# Altium PCB TYPEC_4KTransmitter-v1.0.PcbDoc (part 11 of 12)
Units mil, origin at the board's own origin, x right, y up, seen from the top; angles counter-clockwise.
Board outline 2834.7 x 1259.84 mil, 10 copper layers (Top Layer, GND-1, Signal L1, GND-2, PWR-1, PWR-2, GND-3, Signal L2, GND-4, Bottom Layer), stack 61.686 mil thick; 475 components, 338 nets, 2161 pads, 1240 vias.
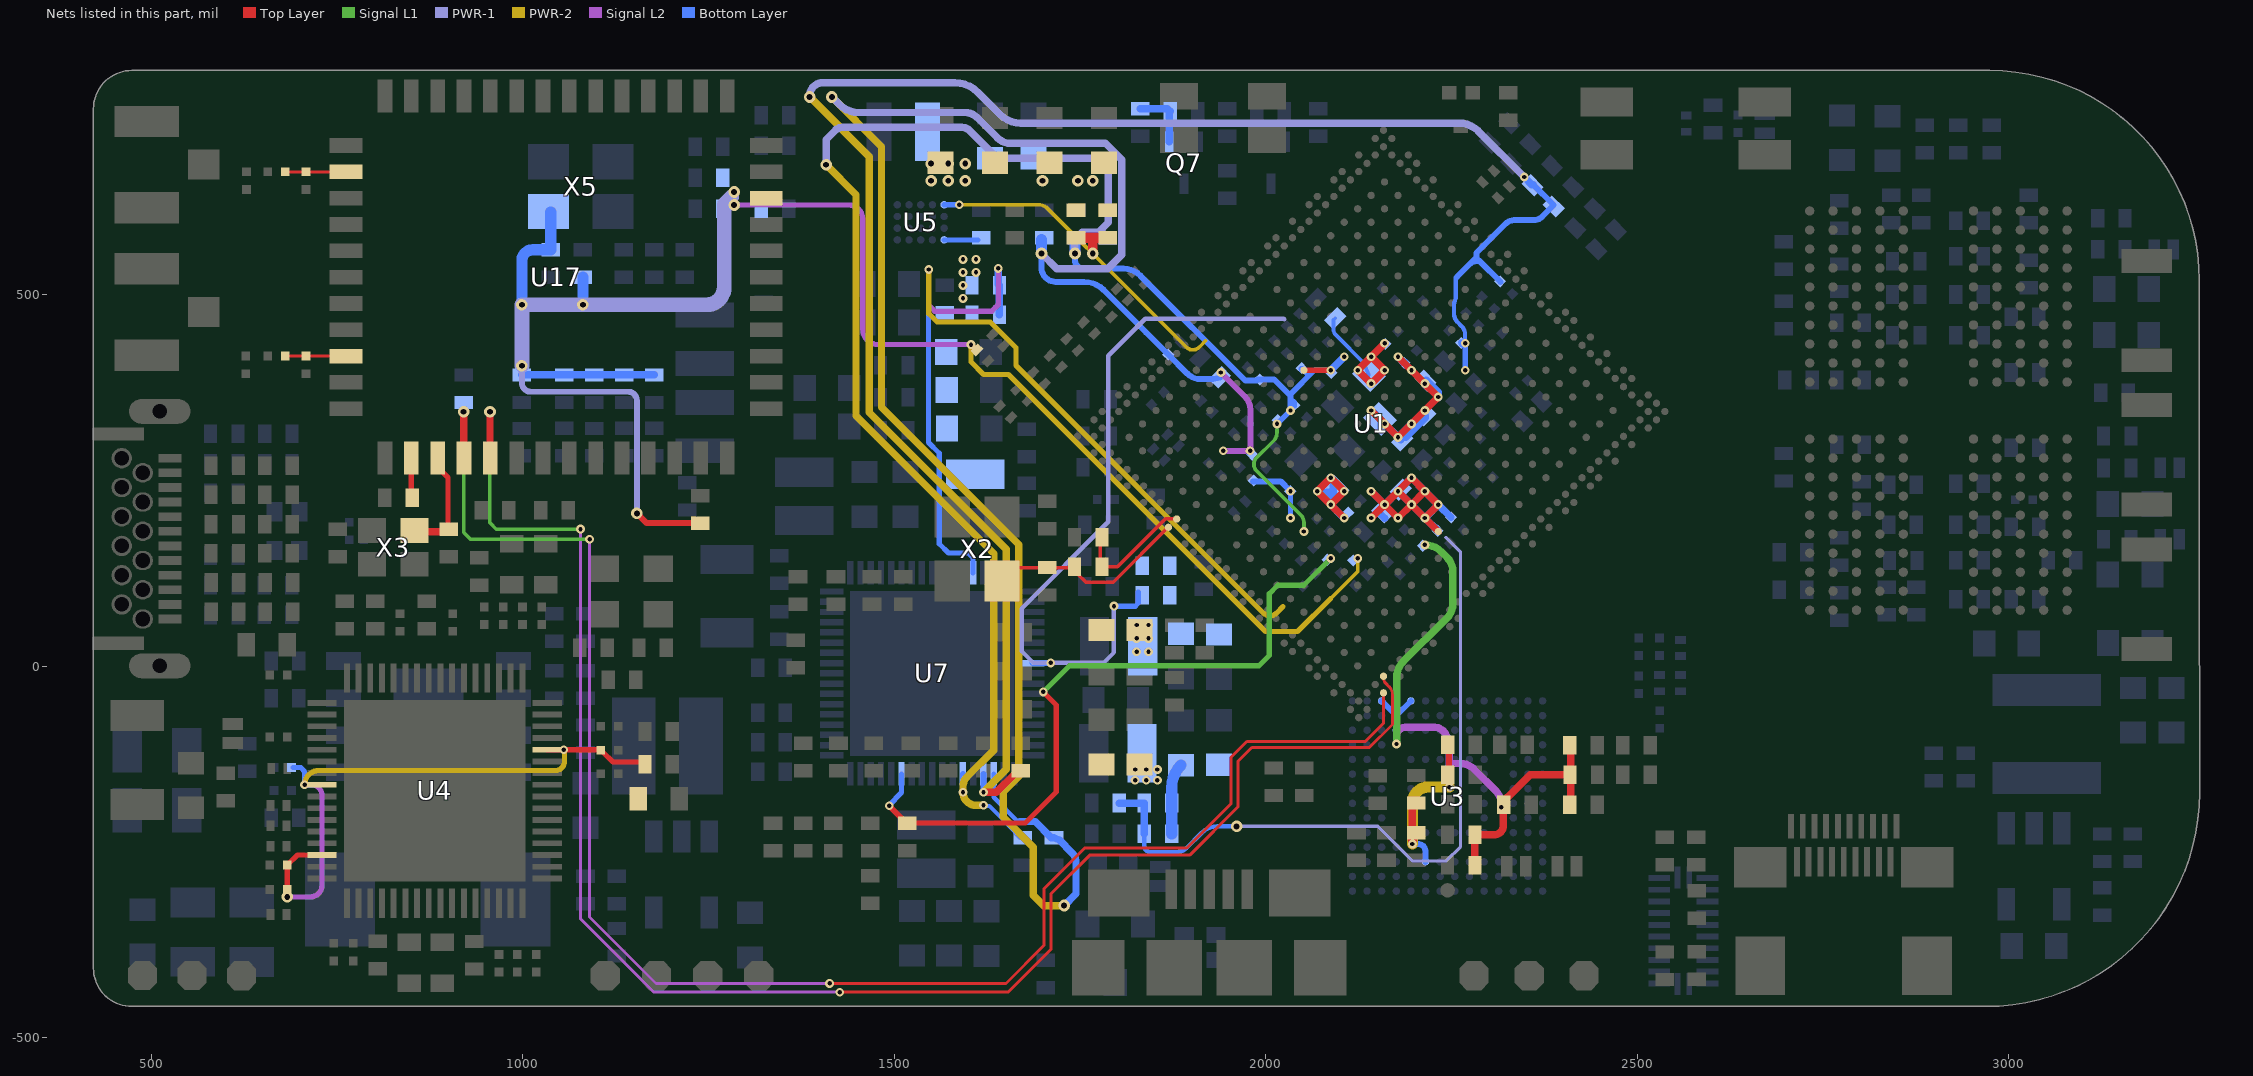
[diagram p17: the nets of this part, all layers, seen from the top]

## Via types
v1: diameter 11.81, hole 5.91, Top Layer to Bottom Layer, tented both sides, 710 vias
v2: diameter 15.75, hole 7.87, Top Layer to Bottom Layer, tented both sides, 265 vias
v3: diameter 11.81, hole 5.91, Top Layer to Signal L1, tented both sides, 146 vias
v4: diameter 11.81, hole 5.91, Signal L2 to Bottom Layer, 60 vias
v5: diameter 11.81, hole 5.91, Signal L1 to Signal L2, 38 vias
v6: diameter 11.81, hole 5.91, Top Layer to Signal L1, 16 vias
v7: diameter 11.81, hole 5.91, Top Layer to Bottom Layer, 4 vias
v8: diameter 11.81, hole 5.91, Signal L1 to Signal L2, tented both sides, 1 vias

## Nets (pads, with @x,y where several pads share a name; then routed paths per layer and width w, separated by ;. In a path a pad name is that pad's centre, name@x,y a point inside that pad or via, vN(x,y) a via of type N, cw(c..) or ccw(c..) an arc to the next point about the centre after c; other vN are vias at no path point) (continued)
VCCIO_FLASH: C133.2 C134.2 C192.2 C193.2 C194.2 C195.2 C253.2 R87.2 R105.1 R106.1 R107.1 U1.1C13 U3.C6 U3.M4 U3.N4 U3.P3 U3.P5 | length 1238.9
  Top Layer w4: v1(2317.36,-190.02) C193.2@2320.06,-192.72 ; C193.2@2318.85,-185.51 C193.2@2320.35,-184.01
  Top Layer w8: C195.2@2245.1,-144.49 cw(c2239.67,-149.93) 2247.36,-149.93 v1(2247.36,-162.98) ; C194.2@2246.47,-104.83 2246.57,-104.94 C195.2@2246.57,-144.49
  Top Layer w10: C192.2@2197.6,-224.45 R107.1@2197.6,-184.31 ; R105.1@2281.79,-268.42 R106.1@2281.79,-227.4 2307.18,-227.4 ccw(c2307.18,-214.52) 2320.06,-214.52 C193.2@2320.06,-192.72 ; C193.2@2320.7,-181.16 2325.35,-176.51 2326.09,-176.51 2356.13,-146.47 C134.2@2409.7,-146.47 ; R87.2@2410.82,-185.07 C134.2@2410.82,-142.83 ; C134.2@2410.82,-142.48 C253.2@2410.82,-102.51
  Top Layer w12: v1(2197.6,-239.54) C192.2@2197.6,-225.45
  Signal L1 w10: v1@2176.33,-104.84 2176.33,-15.68 cw(c2207.17,-15.76) 2185.47,6.14 2242.31,62.98 2243.53,64.07 ccw(c2226.37,83.28) 2252.13,83.28 ; v1(2214.42,162.97) cw(c2214.42,131.88) 2236.4,153.86 2244.27,146 cw(c2225.29,127.02) 2252.13,127.02 2252.13,83.33
  PWR-2 w15: v1(2197.6,-239.54) 2197.6,-183.98 cw(c2218.6,-183.98) 2218.6,-162.98 v1(2247.36,-162.98)
  Signal L2 w10: v1(2176.19,-104.98) 2176.21,-94.25 cw(c2187.87,-94.25) 2187.87,-82.59 2227.94,-82.59 cw(c2227.94,-97.59) 2238.54,-86.98 cw(c1733.81,-591.82) 2238.87,-87.31 cw(c2218.17,-107.9) 2247.37,-107.9 2247.37,-131.21 ; v1(2247.36,-162.98) 2247.37,-131.21 ; v1(2317.36,-190.02) 2317.36,-185.56 ccw(c2293.67,-185.56) 2310.42,-168.81 2280.23,-138.62 ccw(c2262.3,-156.61) 2262.3,-131.21 2247.37,-131.21
  Bottom Layer w8: U3.P3@2156.27,-47.02 U3.N4@2175.96,-66.71 U3.M4@2175.96,-86.39 v1@2175.96,-104.98 ; U3.N4@2175.96,-66.71 U3.P5@2195.64,-47.02 ; v1(2197.6,-239.54) 2205.1,-239.54 cw(c2205.1,-249.77) 2215.33,-249.77 U3.C6@2215.33,-263.56
VCCIO_SD: C19.2 C107.2 U1.1F17 U7.29 | length 956.1
  Top Layer w7: C19.2@1517.68,-211.51 1676.41,-211.51 1718.15,-169.77 1718.15,-52.32 v3(1700.68,-34.85)
  Top Layer w8: v1@1493.32,-188.35 1509.18,-204.22 1509.18,-206.51 1514.18,-211.51 C19.2@1517.68,-211.51
  Signal L1 w7: v3@1700.7,-34.87 1735.92,0.36 1991.02,0.36 2005.01,14.35 2005.01,97.13 2016.48,108.6 2051.48,108.6 v1(2087.75,144.87)
  Bottom Layer w7: v1@1493.32,-187.84 1509.93,-170.25 U7.29@1509.93,-145.21
  Bottom Layer w8: v1(2087.75,144.87) C107.2@2088.9,143.73
  other v1: 1493.32,-188.14
VCCIO_WL: C77.1 C78.2 C150.2 C257.1 R9.1 R51.1 R94.1 R135.1 R136.1 R137.1 R138.1 R139.1 R140.2 U1.1E16 U17.34 X5.4 | length 2554.1
  Top Layer w7: v1(1603.56,432.63) 1603.9,432.63 1610.93,425.59 R9.1@1611.27,425.59
  Top Layer w8: v2(1153.78,205.5) 1167.05,192.23 R51.1@1239.21,192.23
  PWR-1 w8: v2(998.94,404.23) 998.94,381.28 ccw(c1011.07,381.28) 1011.07,369.16 1141.97,369.16 cw(c1141.97,357.34) 1153.78,357.34 v2(1153.78,205.5)
  PWR-1 w10: 1276.22,620.44 v2(1284.72,620.44)
  PWR-1 w20: v2(998.94,404.23) v2(998.94,486.22) v2(1081.12,486.22) 1247.69,486.22 ccw(c1247.69,509.87) 1271.34,509.87 1271.34,621.2 v2@1281.32,631.18
  PWR-2 w5: 2087.2,90.59 2123.94,127.33 v1(2123.94,144.87)
  PWR-2 w7: v1(1603.56,432.63) 1603.56,409.46 1620.49,392.53 1653.8,392.53 1999.93,46.4 2043.01,46.4 2087.2,90.59
  Signal L2 w7: v2(1284.72,620.44) 1439.31,620.44 cw(c1439.31,602.01) 1457.74,602.01 1457.74,453.13 ccw(c1478.25,453.13) 1478.25,432.63 v1(1603.56,432.63)
  Bottom Layer w10: R135.1@998.94,391.73 R136.1@1055.81,391.73 R137.1@1096.24,391.73 R138.1@1136.67,391.73 R139.1@1177.11,391.73
  Bottom Layer w15: v2(998.94,486.22) 998.94,545.31 cw(c1013.86,545.31) 1002.61,555.11 1004.06,556.56 cw(c1013.86,545.31) 1013.86,560.23 C257.1@1037.8,560.23 X5.4@1037.8,611.02 ; v2(1081.12,486.22) R94.1@1081.12,523.23
  other v2: 1284.72,638.09
VDD: C177.2 C263.2 C269.2 C284.2 C285.2 FB6.2 U4.24 U4.30 U4.60 | length 847.7
  Top Layer w7: C285.2@683.24,-267.99 696.83,-254.39 U4.30@729.93,-254.39 ; C269.2@683.27,-297.54 C285.2@683.27,-268.02 ; U4.60@1033.07,-112.66 C177.2@1105.07,-112.66 ; C177.2@1105.37,-113.27 1105.37,-113.58 1107.47,-115.68 1107.78,-115.68 1121.46,-129.36 1163.64,-129.36 C263.2@1164.64,-128.36
  PWR-2 w7: v1(706.5,-159.84) cw(c725.56,-159.84) 725.56,-140.78 1044.13,-140.78 ccw(c1044.13,-128.41) 1056.5,-128.41 v1@1056.5,-112.73
  Signal L2 w7: v2(683.24,-310.72) 714.4,-310.72 ccw(c714.4,-295.19) 729.93,-295.19 729.93,-173.96 ccw(c715.81,-173.96) 715.81,-159.84 v1(706.5,-159.84)
  Bottom Layer w7: C284.2@691.38,-136.47 691.38,-136.74 701.28,-136.74 706.5,-141.95 v1(706.5,-159.84)
  other v1: 1055.5,-112.73
VDD_CPU: C44.1 C44.2 C46.2 C47.2 C48.2 C83.2 C84.2 C87.2 C91.2 C95.2 C99.2 C103.2 L2.2 R21.1 R21.2 U1.1C12 U1.1D11 U1.1D12 U1.1E11 U1.1E12 U1.1E13 U1.1F11 U1.1F12 U1.1F13 U1.1F14 U1.1G13 U5.A4 | length 1090.1
  Top Layer w10: v1(2142.04,199.16) v1(2160.13,217.25) v1(2196.33,253.44) v1(2214.42,235.35) ; v1(2142.04,235.35) v1(2178.23,199.16) v1(2196.33,217.25) ; v1(2178.23,235.35) v1(2196.33,217.25) ; U1.1C12@2232.52,181.06 v1(2214.42,199.16) ; v1(2196.33,217.25) v1(2214.42,235.35) ; v1(2196.33,217.25) v1(2214.42,199.16) ; v1(2214.42,199.16) v1(2232.52,217.25) v1(2214.42,235.35)
  Top Layer w13: v2(1767.35,555.15) 1767.35,576.53
  Top Layer w14: R21.2@1744.86,576.53 1767.35,576.53 C44.2@1787.36,576.53
  PWR-2 w5: v1(1587.53,620.88) 1694.12,620.88 1694.17,620.88 cw(c1694.15,603.47) 1706.47,615.76 1758.21,564.03 cw(c1466.48,254.28) 1767.09,555.42 v2(1767.35,555.15) 1893.41,429.09 ccw(c1902,437.68) 1902,425.54 ccw(c1902,437.68) 1910.58,429.09 1919.44,437.95
  Bottom Layer w7: U5.A4@1567.36,620.81 v1@1587.86,620.81
  Bottom Layer w10: v1(2142.04,235.35) v1@2158.4,218.99 ; C91.2@2155.36,203.91 C91.2@2160.11,199.16 ; v1(2160.13,217.25) v1(2178.23,235.35) ; v1@2218.35,203.09 v1(2232.52,217.25) ; C83.2@2231.46,182.12 v1(2214.42,199.16) 2180.91,232.67 2180.91,238.03 v1(2178.23,235.35) ; C87.2@2249.56,200.21 v1(2232.52,217.25) ; v1(2178.23,235.35) v1(2196.33,253.44) v1(2214.42,235.35) v1(2232.52,217.25)
  other v2: 1549.86,653.19 1572.86,653.19 1595.86,653.19 1699.86,653.19 1747.36,653.19 1767.36,653.19 1549.86,676.19 1572.86,676.19 1595.86,676.19
VDD_GPU: C60.1 C60.2 C62.1 C64.2 C89.2 C93.2 C97.2 C101.2 C105.2 L4.1 R19.1 R19.2 U1.1L8 U1.1L9 U1.1M7 U1.1M8 U1.1M9 U7.8 | length 1200
  Top Layer w10: v1(2160.14,434.4) v1(2142.04,416.3) ; v1(2142.04,416.3) v1(2123.94,398.21) v1(2142.04,380.11) v1(2160.14,398.21) v1(2142.04,416.3)
  PWR-1 w6: v1(1795.92,80.6) 1795.92,18.25 1781.81,4.13 v1(1710.97,4.13) 1687.57,4.13 1671.54,20.16 1671.54,77.25 1788.25,193.96 1788.25,417.63 1837.85,467.24 2024.31,467.24 2024.82,466.72
  Bottom Layer w5: C93.2@2093.78,468.07 2091.3,465.6 2091.3,452.87 ccw(c2100.79,452.87) 2094.08,446.16 C105.2@2133.6,406.63 ; C105.2@2133.1,406.93 C105.2@2138.98,391.59
  Bottom Layer w6: v1@1710.81,3.97 v1(1710.97,4.13)
  Bottom Layer w7: v1@1795.98,80.55 1824.58,80.55 1828.68,84.65 C60.2@1828.68,99.53
  Bottom Layer w8: U7.8@1686.51,3.81 v1@1710.65,3.81
  other v1: 1826.36,19.13 1842.36,19.13 1826.36,37.13 1842.36,37.13 1826.36,55.13 1842.36,55.13
VDD_LOGIC: C51.1 C51.2 C61.1 C63.2 C88.2 C92.2 C96.2 C98.2 C100.2 C104.2 C262.2 L3.1 R18.1 R18.2 R20.1 U1.1H7 U1.1H8 U1.1H9 U1.1H10 U1.1J7 U1.1J10 U1.1K7 U1.1K10 U1.1L7 | length 1589.4
  Top Layer w10: v1(2142.04,343.92) v1(2160.14,325.83) v1(2178.23,307.73) v1(2232.52,362.02) v1(2214.42,380.11) v1(2196.33,398.21) v1(2178.23,416.3)
  PWR-1 w4.5: v2(1961.01,-215.86) 2151.01,-215.86 2197.59,-262.44 2242.95,-262.44 2262.36,-243.03 2262.36,152.97 2242.31,173.02
  Bottom Layer w6: R18.1@1836.68,-225.97 1836.68,-241.97 ccw(c1845.24,-241.97) 1845.24,-250.53 1880.18,-250.53 ccw(c1880.18,-231.8) 1893.42,-245.05 1914.02,-224.45 cw(c1934.71,-245.1) 1934.71,-215.86 v2(1961.01,-215.86)
  Bottom Layer w8: v1@2181.18,413.36 2209.63,384.9 C262.2@2216.21,384.9 ; C96.2@2211.61,341.11 v1(2214.42,343.92) v1(2232.52,362.02)
  Bottom Layer w10: R20.1@1802.89,-184.42 R20.1@1802.89,-184.42 1820.14,-184.47 1820.19,-184.51 1820.23,-184.47 C51.1@1836.73,-184.47 ; C51.1@1836.68,-184.42 C51.1@1836.73,-184.47 ; R18.1@1836.82,-225.97 1836.82,-184.56 C51.1@1836.73,-184.47 ; v1(2160.14,325.83) v1(2142.04,343.92) 2142.83,343.92 C92.2@2178.62,308.12 ; v1(2178.23,307.73) C92.2@2179.02,307.73 ; v1(2178.23,416.3) 2185.97,408.56 C88.2@2187.55,408.56 ; C92.2@2181.76,304.67 2181.76,304.98 C92.2@2179.02,307.73 ; C96.2@2214.42,342.9 C96.2@2214.42,343.08 ; v1(2214.42,343.92) C96.2@2214.42,343.08 ; C96.2@2215.27,337.11 2215.27,334.37 2188.63,307.73 C92.2@2179.02,307.73 ; C262.2@2216.21,384.9 2232.52,368.6 v1(2232.52,362.02) ; C92.2@2178.62,308.12 v1(2196.33,325.83) 2196.67,326.17 2197.7,326.17 2213.52,341.99 2213.52,342.53 2214.07,343.08 C96.2@2214.42,343.08 ; C92.2@2178.62,308.12 C92.2@2179.02,307.73
  Bottom Layer w15: R18.2@1873.68,-225.97 C51.2@1873.68,-184.42 1873.68,-163.65 cw(c1916.36,-163.65) C63.2@1886.18,-133.47
  other v1: 1824.36,-153.91 1839.36,-153.91 1854.36,-153.91 1824.36,-139.23 1839.36,-139.28 1854.36,-139.28
VDD_NPU: C69.2 C70.2 C72.1 C72.2 C90.2 C94.2 C102.2 C106.2 L6.1 R26.1 R26.2 U1.1G15 U1.1H14 U1.1H15 U1.1J14 U1.1J15 U7.64 | length 1644.8
  Top Layer w10: v1(2105.85,199.16) v1(2087.75,217.25) ; v1(2087.75,217.25) v1(2105.85,235.35) v1(2087.75,253.44) v1(2069.66,235.35) v1(2087.75,217.25)
  PWR-2 w7: v1(1546.77,533.62) 1546.77,474.19 1558.1,462.86 1629.37,462.86 1663.87,428.36 1663.87,404.57 1997.34,71.1 ccw(c2005.93,79.68) 2005.93,67.54 ccw(c2005.93,79.68) 2014.51,71.09 2023.37,79.95
  Signal L2 w7: v1(1546.77,533.62) 1546.27,533.12 1546.27,486.06 1554.84,477.49 1631.31,477.49 1640.32,486.5 v1(1640.32,535.1)
  Bottom Layer w7: v1(1546.77,533.62) 1546.27,533.12 1546.27,300.66 1560.68,286.24 1560.68,164.61 1573.27,152.02 1600.12,152.02 1606.25,145.89 1606.25,125.4 U7.64@1606.39,125.27
  Bottom Layer w10: v1(1640.32,535.1) 1640.46,534.96 1640.46,513.86 R26.1@1641.79,512.53 C72.2@1641.79,472.66 ; v1(2069.66,235.35) 2070.95,234.05 C94.2@2090.83,234.05 ; v1(2087.75,253.44) 2090.83,250.37 C94.2@2090.83,234.05 ; v1@2104.7,200.31 v1(2087.75,217.25) 2087.75,230.98 C94.2@2090.83,234.05
  other v1: 1592.79,494.73 1592.79,512.23 1592.79,529.73 1610.29,529.73 1592.79,547.23 1610.29,547.23
VDDA0V9_IMAGE: C13.2 C148.2 C149.1 C152.2 C160.2 C162.2 C171.2 C173.2 U1.1H17 U1.1N9 U1.1N10 U1.1N13 U1.1N14 U1.1P11 U7.23 | length 2513
  Top Layer w7: U1.1P11@2051.57,398.2 v1(2087.75,398.21)
  Signal L1 w5: v1(2015.37,325.83) 2015.37,313.92 cw(c2000.37,313.92) 2010.99,303.32 1987.2,279.53 ccw(c1994.27,272.46) 1984.27,272.46 1984.27,270.65 ccw(c1994.27,270.65) 1987.2,263.58 2047.17,203.61 cw(c2036.56,193) 2051.56,193 v1(2051.56,181.06)
  PWR-1 w10: v2(1408.49,674.57) 1408.49,708.66 1420.47,720.64 cw(c1431.07,710.03) 1431.07,725.03 1591.14,725.03 cw(c1591.14,710.03) 1601.74,720.64 1631,691.38 ccw(c1650.13,710.51) 1650.13,683.46 1774.3,683.46 1788.27,669.49 1788.27,597 1775.29,584.03 1753.21,584.03 1743.36,574.17 v2(1743.36,555.15)
  PWR-2 w10: v2(1408.49,674.57) 1448.74,634.32 1448.74,336.65 1633.97,151.42 1633.97,-113.36 1598.08,-149.25 ccw(c1611.09,-162.25) 1592.7,-162.25 v1(1592.7,-169.97) ccw(c1610.2,-169.97) 1610.2,-187.47 v1(1620.26,-187.47)
  Bottom Layer w4.1: U7.23@1592.61,-145.21 U7.23@1592.65,-145.25
  Bottom Layer w6: v1(1620.26,-187.47) 1621.23,-188.44 1628.36,-188.44 1663.68,-223.77 1663.68,-224.97 1669.68,-230.97 C13.2@1673.18,-230.97 ; v1(2033.47,343.92) C162.2@2039.47,349.92
  Bottom Layer w7: C160.2@2047.49,400.16 C160.2@2048.49,399.16 ; C160.2@2049.19,400.06 2058.4,390.85
  Bottom Layer w7.5: C162.2@2038.29,351.77 2038.29,354.82 2033.54,359.58 2033.54,365.79 2066.06,398.3 2087.66,398.3 v1(2087.75,398.21)
  Bottom Layer w8: v1@1592.65,-169.84 U7.23@1592.65,-145.25 ; v2(1743.36,555.15) 1743.36,546.39 ccw(c1755.06,546.4) 1752.99,534.89 1754.36,534.77 1808.89,534.77 cw(c1808.89,502.85) 1831.46,525.42 1972.68,384.2 1988.04,384.2 1989.51,385.68 2011.45,385.68 2033.44,363.68 v1(2033.47,343.92) ; C148.2@1743.36,574.03 cw(c1745.86,574.03) C148.2@1745.86,576.53 ; v1(2015.37,325.83) v1(2033.47,343.92)
  Bottom Layer w10: C149.1@2087.89,398.07 2105.85,416.02 v1(2105.85,416.3)
  Bottom Layer w15: v2(1743.36,555.15) C148.2@1743.36,574.03 ; C148.2@1745.86,576.53 C173.2@1787.36,576.53
VDDA0V9_PMU: C16.2 C119.1 C124.2 C131.2 C132.1 U1.1N16 U1.1P17 U7.20 | length 2738.3
  PWR-1 w10: v2(1416.19,765.98) 1426.66,755.5 ; 1426.69,755.48 ccw(c1451.96,780.8) 1451.96,745.03 1595.29,745.03 cw(c1595.29,721.94) 1611.61,738.27 1611.65,738.23 1639.12,710.77 ccw(c1656.89,728.54) 1656.89,703.4 1784.53,703.4 1806.54,681.39 1806.54,553.56 1787.8,534.83 1718.68,534.83 v2(1698.36,555.15)
  PWR-2 w10: v2(1416.19,765.98) 1483.05,699.11 1483.05,348.04 1667.6,163.5 1667.6,-148.5 1646.78,-169.31 1646.78,-203.25 1687.53,-244 1687.53,-308.8 1701.21,-322.47 v2(1728.85,-322.47)
  Signal L2 w8: v1(1939.85,395.03) 1972.26,362.62 1972.34,362.54 cw(c1955.1,345.35) 1979.45,345.35 v1@1979.45,289.9 ; v1(1942.99,289.64) v1(1979.18,289.64) v1(1942.99,289.64)
  Bottom Layer w6: U7.20@1633.95,-145.21 1633.95,-176.82 1666.73,-209.6
  Bottom Layer w7: v1@1943.09,289.73 1973.42,289.73 1975.52,287.64 C131.2@1977.49,287.64
  Bottom Layer w8: v2(1698.36,555.15) 1698.35,536.19 ccw(c1717.54,536.19) 1717.54,517 1755.63,517 cw(c1755.63,479.45) 1782.18,506 1839.12,449.06 C124.2@1869.01,419.17 1894.65,393.53 ccw(c1912.76,411.64) 1912.72,386.03 1928.95,386.03 C119.1@1938.44,388.45
  Bottom Layer w10: 1669.12,-209.33 1690.04,-209.33 1711.68,-230.97 C16.2@1715.18,-230.97 1722.68,-234.67 1739.21,-251.19 cw(c1725.5,-264.86) 1744.86,-264.88 1744.86,-306.46 v2(1728.85,-322.47)
  Bottom Layer w15: v2(1698.36,555.15) C132.1@1698.35,574.03
VDDA_0V9: C15.2 C121.1 C126.2 C135.2 C138.2 C139.2 C143.2 U1.1H5 U1.1J4 U1.1J17 U1.1K16 U7.21 | length 2686.4
  Top Layer w10: v1@1621.09,-169.97 1637.64,-169.97 1662.68,-144.93 1662.68,-144.76 1666.68,-140.76 C15.2@1670.18,-140.76
  PWR-1 w10: v2(1386.28,765.98) 1386.28,767.36 cw(c1403.99,767.36) 1403.99,785.06 1581.89,785.06 1581.96,785.06 cw(c1581.96,741.93) 1612.51,772.38 1641.36,743.53 1642.73,742.16 ccw(c1670.16,769.58) 1670.16,730.79 2260.05,730.79 cw(c2260.05,693.71) 2286.26,719.95 2286.32,719.89 v1(2348.06,658.14)
  PWR-2 w10: v2(1386.28,765.98) 1466.7,685.56 1466.7,341.24 1651.05,156.9 1651.05,-139.18 v1(1620.26,-169.97)
  Bottom Layer w4.1: v1@1620.17,-169.88 v1@1620.21,-169.84 ; U7.21@1620.17,-145.21 U7.21@1620.21,-145.25
  Bottom Layer w5.7: 2253.72,473.7 ccw(c2268.72,473.7) 2258.11,463.1 ; 2253.72,473.8 2253.72,487.34 cw(c2259.42,487.34) 2254.02,489.17 2255.01,492.08 ccw(c2231.01,500.24) 2255.03,492.16 2256.03,495.1 2256.03,522.76 ; 2258.12,463.1 2264.11,457.1 cw(c2253.51,446.49) 2268.51,446.49 ; C126.2@2268.51,434.5 2268.51,446.49 ; 2268.51,446.59 2268.51,446.49
  Bottom Layer w6: 2256.71,522.76 2257.71,523.76
  Bottom Layer w7: C135.2@2032.61,233.14 C135.2@2033.14,233.68 ; v1(2033.47,199.16) 2033.47,231.38 2033.14,231.7 C135.2@2033.14,233.68 ; v1(2033.47,235.35) 2033.14,235.02 C135.2@2033.14,233.68 ; C135.2@2033.86,234.39 C135.2@2033.14,233.68
  Bottom Layer w8: v1@1620.21,-169.84 U7.21@1620.21,-145.25 ; C121.1@1982.93,248.55 2020.27,248.55 v1(2033.47,235.35) ; 2257.71,523.76 2257.71,523.88 2275.62,541.8 ; C126.2@2262.71,435.52 2264.61,433.62 2268.71,429.52 v1(2268.71,398.21) ; C143.2@2316.3,516.85 2288.37,544.78 ; C139.2@2360.31,647.98 2387.81,620.48 2371.75,604.42 cw(c2361.14,615.03) 2361.14,600.03 2334.07,600.03 ccw(c2334.07,585.03) 2323.47,595.64 2283.91,556.08 2283.91,549.97 ; 2283.91,549.97 2283.8,549.97 2275.64,541.81 cw(c2282.83,534.59) 2282.83,544.78 2288.37,544.78 ; 2283.91,549.97 2283.91,549.24 2288.37,544.78
  Bottom Layer w10: C126.2@2264.61,433.62 2265.39,434.4 v1(2268.71,434.4) ; v1(2348.06,658.14) 2358.23,647.98 C139.2@2360.31,647.98
VSEL_EXTDCDC: R13.1 U5.A1 | length 45.6
  Bottom Layer w7: U5.A1@1567.36,573.56 R13.1@1612.93,573.56
WIFI_HOST_WAKE: U1.B34 U17.16 | length 2292.5
  Top Layer w4: v1(1426.96,-439.08) 1653.29,-439.08 1710.97,-381.41 1710.97,-306.91 1763.29,-254.58 1897.78,-254.58 1962.68,-189.68 1962.68,-128.5 1981.52,-109.66 2139.67,-109.66 2170.67,-78.67 2170.67,-38.47 ccw(c2155.61,-38.47) 2166.28,-27.84 ; U1.B34@2158.75,-13.81 2158.75,-16.15 ccw(c2168.78,-16.15) 2161.68,-23.24 2166.26,-27.82
  Top Layer w10: U17.16@956.08,280.16 v2(956.08,342.23)
  Signal L1 w4.7: v2(956.08,342.23) 956.08,192.94 964.71,184.3 v5(1077.88,184.3)
  Signal L2 w4: v5(1077.88,184.3) 1078.13,184.05 1078.13,-340.54 1176.67,-439.08 v1(1426.96,-439.08)
WIFI_REG_ON: R89.2 U1.A35 U17.15 | length 2279.1
  Top Layer w4: v1(1413.13,-427.18) 1650.55,-427.18 1701.47,-376.26 1701.47,-300.07 1756.46,-245.08 1893.84,-245.08 1953.18,-185.74 1953.18,-123.23 1974.75,-101.66 2134.24,-101.66 2158.75,-77.15 U1.A35@2158.75,-36.08
  Top Layer w10: U17.15@920.65,280.16 v2(920.65,342.23)
  Signal L1 w4.7: v2(920.65,342.23) 920.65,179.73 929.5,170.88 1089.71,170.88 v5(1090.13,170.46)
  Signal L2 w4: v5(1090.13,170.46) 1090.13,-337.83 1179.48,-427.18 v1(1413.13,-427.18)
WIFI_XTAL_IN: R159.2 U17.13 | length 53.2
  Top Layer w7: R159.2@850.21,230.05 U17.13@850.21,279.73 ; R159.2@855.35,226.73 R159.2@855.35,230.23
WIFI_XTAL_OUT: C273.2 U17.14 X3.1 | length 151.8
  Top Layer w7: U17.14@885.65,279.73 885.65,267.42 891.99,261.08 899.48,253.59 899.48,182.05 C273.2@900.64,180.89
  Top Layer w10: X3.1@854.4,182.15 855.66,180.89 C273.2@900.64,180.89
WL_ANT0: C6.1 C182.2 U17.2 | length 81.6
  Top Layer w4.2: C6.1@680.6,665.16 C182.2@708.29,665.16 U17.2@762.22,665.16
WL_ANT1: C7.1 C183.2 U17.9 | length 81.6
  Top Layer w4.2: C7.1@680.6,417.13 C183.2@708.29,417.13 U17.9@762.22,417.13
WORK_LED: Q7.1 R34.1 R42.2 | length 82.8
  Bottom Layer w10: R34.1@1831.36,750.23 1867.63,750.23 R42.2@1871.01,746.85 ; Q7.1@1870.39,705.5 1870.39,745.49 R42.2@1871.63,746.73
XIN24M: R43.2 R46.1 U1.AD37 | length 166.6
  Top Layer w4: U1.AD37@1879.64,197.05 U1.AD37@1880.36,197.77
  Top Layer w4.7: R43.2@1777.78,133.53 1800.62,133.53 1864.98,197.89 U1.AD37@1880.24,197.89 ; R43.2@1777.78,138.53 R46.1@1777.78,175.03
XOUT24M: C130.2 R43.1 U1.AD38 X2.3 | length 268.2
  Top Layer w4.7: X2.3@1648.25,114.22 1666.56,132.53 1702.28,132.53 1738.28,132.53 1747.73,123.08 1748.02,123.08 1758.21,112.88 1794.73,112.88 U1.AD38@1869.69,187.84
pads on no net: J2.4 J7.2 U1.1A4 U1.1A13 U1.1A15 U1.1A17 U1.1A18 U1.1B13 U1.1B17 U1.1B20 U1.1C2 U1.1C15 U1.1D2 U1.1D19 U1.1D20 U1.1E19 U1.1E20 U1.1F18 U1.1F19 U1.1H3 U1.1H19 U1.1H20 U1.1J19 U1.1J20 U1.1K19 U1.1K20 U1.1L1 U1.1N1 U1.1N2 U1.1N20 U1.1P2 U1.1P3 U1.1P4 U1.1P18 U1.1R1 U1.1R2 U1.1R16 U1.1R17 U1.1R18 U1.1T1 U1.1T2 U1.1T4 U1.1T18 U1.1T19 U1.1T20 U1.1U1 U1.1U3 U1.1U4 U1.1U5 U1.1U6 U1.1U8 U1.1U11 U1.1U19 U1.1U20 U1.1V2 U1.1V3 U1.1V8 U1.1V11 U1.1V15 U1.1V16 U1.1V20 U1.A22 U1.A26 U1.AA37 U1.AA38 U1.AB1 U1.AB2 U1.AB37 U1.AB38 U1.AC2 U1.AD1 U1.AF1 U1.AF37 U1.AG2 U1.AG37 U1.AH2 U1.AJ1 U1.AJ2 U1.AJ38 U1.AK2 U1.AK37 U1.AL1 U1.AL2 U1.AM1 U1.AM2 U1.AM37 U1.AM38 U1.AN2 U1.AN37 U1.AN38 U1.AP1 U1.AP3 U1.AP4 U1.AP5 U1.AP6 U1.AP7 U1.AP9 U1.AP10 U1.AP20 U1.AP21 U1.AP23 U1.AP24 U1.AP26 U1.AP27 U1.AP29 U1.AP30 U1.AR2 U1.AR4 U1.AR6 U1.AR7 U1.AR9 U1.AR10 U1.AR20 U1.AR21 U1.AR23 U1.AR24 U1.AR26 U1.AR27 U1.AR29 U1.AR30 U1.B22 U1.B26 U1.C37 U1.D37 U1.G38 U1.J37 U1.J38 U1.K37 U1.K38 U1.M37 U1.M38 U1.N37 U1.N38 U1.T37 U1.V37 U1.V38 U1.W37 U1.W38 U1.Y1 U1.Y2 U3.A1 U3.A2 U3.A7 U3.A8 U3.A9 U3.A10 U3.A11 U3.A12 U3.A13 U3.A14 U3.B1 U3.B7 U3.B8 U3.B9 U3.B10 U3.B11 U3.B12 U3.B13 U3.B14 U3.C1 U3.C3 U3.C5 U3.C7 U3.C8 U3.C9 U3.C10 U3.C11 U3.C12 U3.C13 U3.C14 U3.D1 U3.D2 U3.D3 U3.D4 U3.D12 U3.D13 U3.D14 U3.E1 U3.E2 U3.E3 U3.E5 U3.E8 U3.E9 U3.E10 U3.E12 U3.E13 U3.E14 U3.F1 U3.F2 U3.F3 U3.F10 U3.F12 U3.F13 U3.F14 U3.G1 U3.G2 U3.G3 U3.G10 U3.G12 U3.G13 U3.G14 U3.H1 U3.H2 U3.H3 U3.H12 U3.H13 U3.H14 U3.J1 U3.J2 U3.J3 U3.J12 U3.J13 U3.J14 U3.K1 U3.K2 U3.K3 U3.K6 U3.K7 U3.K10 U3.K12 U3.K13 U3.K14 U3.L1 U3.L2 U3.L3 U3.L12 U3.L13 U3.L14 U3.M1 U3.M2 U3.M3 U3.M7 U3.M8 U3.M9 U3.M10 U3.M11 U3.M12 U3.M13 U3.M14 U3.N3 U3.N6 U3.N7 U3.N8 U3.N9 U3.N10 U3.N11 U3.N12 U3.N13 U3.N14 U3.P1 U3.P2 U3.P7 U3.P8 U3.P9 U3.P10 U3.P11 U3.P12 U3.P13 U3.P14 U4.19 U4.31 U4.35 U4.36 U4.37 U4.38 U4.39 U4.40 U4.41 U4.42 U4.43 U4.44 U7.32 U7.34 U7.39 U7.40 U7.41 U7.42 U7.43 U7.60 U12.A1 U12.A2 U12.A11 U12.A12 U12.AA1 U12.AA12 U12.AB1 U12.AB2 U12.AB11 U12.AB12 U12.B1 U12.B12 U12.G11 U12.K5 U12.K8 U12.N5 U12.N8 U17.12 U17.33 U17.35 U17.37 U17.44 U17.45 U17.46 U17.47 U17.48

## Polygon pours and split planes (outlines as drawn)
VCCIO_FLASH on Signal L2 "VCCIO_FLASH_L08_P080" (solid, pour order 80): 2161.48,-106.72 2165.59,-110.83 2231.5,-110.83 2237.34,-116.67 2237.34,-193.42 2244.71,-200.79 2339.83,-200.79 2345.89,-194.73 2345.89,-68.17 2339.22,-61.5 2165.31,-61.5 2161.48,-65.33
GND on Signal L2 "GND_L08_P059" (solid, remove dead copper, pour order 59): 3158.57,-49.8 3171.08,-37.29 3171.08,25.75 3171.08,604.85 3034.41,741.52 682.16,741.52 ccw(c682.16,690.72) 631.36,690.72 631.36,-335.06 1072.65,-335.06 1173.48,-435.89 1173.48,-458.27 631.36,-458.27 422.36,-458.27 422.36,801.57 2974.44,801.57 cw(c2974.41,519.28) 3256.7,519.23 3257,171.83 3257.05,-170.52 cw(c2969.34,-170.57) 2969.38,-458.27 2504.21,-458.27 2504.21,-49.8
VCCA_1V8 on Signal L2 "SIG6-VCCA_1V8" (solid, remove dead copper, pour order 35): 2021.43,225.31 2034.68,212.07 2046.38,212.07 2186.56,352.26 2246.69,352.26 2280.02,385.59 2280.02,422.37 2295.3,437.65 2368.23,364.72 2368.23,334.87 2351.29,334.87 2196.9,180.49 2197.36,180.04 2197.36,24.48 2189.07,16.2 2038,16.2 2028.98,25.23 2028.98,105.95 1959.47,175.46 1806.93,175.46 1806.93,225.31
VDDA_0V9 on Signal L2 "VDDA_0V9_L08_P069" (solid, pour order 69): 1988.26,262.52 2196.33,470.59 2255.54,470.59 2281.1,445.03 2280.02,443.95 2280.02,385.59 2219.9,385.59 2051.56,217.25 2033.53,217.25
VCC_3V3 on Signal L2 "SIG6-VCC_3V3" (solid, remove dead copper, pour order 36): 2119.85,427.53 2132.35,427.53 2202.35,497.53 2222.35,497.53 2274.85,445.03 2287.35,445.03 2309.85,467.53 2309.85,540.03 2207.35,642.53 2187.35,642.53 2107.16,562.33 2107.16,440.22
GND on Bottom Layer "GND_L10_P071" (solid, remove dead copper, pour order 71): 422.36,-406.75 ccw(c473.88,-406.75) 473.88,-458.27 2969.38,-458.27 ccw(c2969.34,-170.56) 3257.05,-170.52 3257,171.83 3256.7,519.23 ccw(c2974.4,519.27) 2974.44,801.57 473.88,801.57 ccw(c473.88,750.05) 422.36,750.05
NetL2_1 on Bottom Layer "Bottom Layer-$25N1148" (solid, remove dead copper, pour order 12): 1457.74,602.01 1460.28,599.47 1523.09,599.47 1525.57,601.95 1525.57,639.15 1517.36,647.36 1517.36,758.53 1457.74,758.53
VCC3V3_SYS on Bottom Layer "VCC3V3_SYS_L10_P079" (solid, pour order 79): 1425.67,186.07 1450.03,186.07 1462.73,173.37 1475.66,173.37 1479.43,177.15 1479.43,226.42 1425.67,226.42
VCC_3V3 on Bottom Layer "Bottom Layer-VCC_3V3" (solid, remove dead copper, pour order 6): 1484.78,180.22 1478.04,173.48 1478.04,132.6 1486.82,132.6 1486.82,146.02 1507.2,166.4 1509.23,166.4 1509.39,166.56 1530.8,166.56 1532.68,168.44 1532.68,226.42 1484.78,226.42
NetL7_2 on Bottom Layer "Bottom Layer-$26N2279" (solid, remove dead copper, pour order 25): 1586.44,-192.17 1586.45,-240.28 1503.81,-240.28 1503.81,-194.31 1541.15,-194.31 1560.72,-174.74 1560.72,-129.46 1569.5,-129.46 1569.5,-168.97 ccw(c1593.84,-168.97)
VCCA_1V8 on Bottom Layer "VCCA_1V8_L10_P002" (solid, pour order 2): 1736.98,126.26 1745.24,134.53 1766.76,134.53 1775.22,134.53 1775.22,164.47 1914.08,164.47 1914.08,210.41 1838.83,210.41 1830.59,218.65 1807.74,218.65 1807.74,172.71 1720.92,172.71 1720.92,90.41 1707.05,76.54 1686.51,76.54 1686.51,68.99 1711.05,68.99 1736.98,94.92
NetL6_2 on Bottom Layer "Bottom Layer-$26N1977" (solid, remove dead copper, pour order 1): 1569.77,171.55 1579.47,161.85 1604.59,161.85 1620.75,145.69 1648.43,173.36 1648.43,222.3 1569.77,222.3
VCC3V3_SYS on Bottom Layer "VCC3V3_SYS_L10_P032" (solid, pour order 32): 1718.37,68.58 1713.04,63.26 1670.76,63.26 1670.76,50.68 1727.14,50.68 1727.14,68.58
VCC_1V8 on Bottom Layer "Bottom Layer-VCC_1V8" (solid, remove dead copper, pour order 9): 1334.18,225.12 1418.55,225.12 1418.55,280.56 1399.49,299.63 1399.49,424.49 1394.34,429.63 1349.11,429.63 1344.18,424.7 1344.18,314.58 1334.18,304.58
GND on Bottom Layer "Bottom Layer-GND 3" (solid, remove dead copper, pour order 23): 1612.62,448.53 1612.62,301.08 1615.3,298.4 1647.49,298.4 1652.62,303.53 1652.62,448.53 1647.62,453.53 1617.62,453.53
GND on Bottom Layer "GND_L10_P068" (solid, pour order 68): 448.03,-358.23 800.32,-358.23 819.36,-377.27 819.36,-458.27 468.8,-458.27 448.03,-437.5
VCC3V3_SYS on Bottom Layer "VCC3V3_SYS_L10_P065" (solid, pour order 65): 1340.01,-22.94 1364.09,-22.94 1368.76,-18.27 1368.76,4.15 1386.53,21.92 1431.78,21.92 1431.78,13.26 1395.8,13.26 1381.96,-0.58 1381.96,-60.8 1363.05,-79.71 1340.01,-79.71 1340.01,-67.8
VCC5V0_SYS on Bottom Layer "Bottom Layer-VCC5V0_SYS 1" (solid, remove dead copper, pour order 11): 1404.93,594.84 1404.93,535.2 1479.41,535.2 1479.41,425.75 1472.68,419.02 1472.68,392.53 1490.68,392.53 1490.68,417.53 1495.06,421.9 1531.24,421.9 1535.18,425.84 1535.18,531.47 1525.57,541.08 1525.57,592.37 1523.1,594.84
VDD_LOGIC on Bottom Layer "Bottom Layer-VDD_LOGIC" (solid, remove dead copper, pour order 24): 1894.95,-160.24 1850.13,-160.24 1798.47,-160.24 1798.47,-72.65 1854.86,-72.65 1854.86,-99.99 1950.82,-99.99 1954.68,-103.86 1954.68,-155.4 1949.84,-160.24
VCC5V0_SYS on Bottom Layer "VCC5V0_SYS_L10_P000" (solid, pour order 0): 782.47,-66.51 517.18,-66.51 517.18,-245.87 641.81,-245.87 641.81,-157.63 600.09,-157.63 600.09,-123.92 782.47,-123.92
VCC0V6_DDR on Bottom Layer "VCC0V6_DDR_L10_P054" (solid, pour order 54): 2978.52,2.63 3178.82,2.63 3178.82,98.85 3247.36,98.85 3247.36,-57.16 2978.52,-57.16
NetL5_1 on Bottom Layer "Bottom Layer-$26N4974" (solid, remove dead copper, pour order 5): 1452.84,180.22 1459.14,173.91 1459.14,152.74 1459.14,125.27 1450.48,125.27 1450.48,146.12 1441.48,155.13 1378.1,155.13 1362.33,170.9 1338.06,170.9 1334.18,174.77 1334.18,217.43 1418.55,217.43 1418.55,180.22
VCC3V3_SYS on Bottom Layer "VCC3V3_SYS_L10_P004" (solid, pour order 4): 448.03,-344.58 687.51,-344.58 687.51,-382.33 819.36,-382.33 819.36,-251.28 448.03,-251.28
NetL10_1 on Bottom Layer "NETL10_1_L10_P053" (solid, pour order 53): 3043.51,-181.19 cw(c3043.51,-190.86) 3053.18,-190.87 3053.18,-240.57 3108.89,-240.57 3108.89,-199.13 3126.19,-181.83 3126.19,-128.97 2978.52,-128.97 2978.52,-181.19
VCC3V3_PMU on Bottom Layer "VCC3V3_PMU_L10_P044" (solid, pour order 44): 1460.2,-173.31 1468.61,-164.91 1478.04,-164.91 1478.04,-129.46 1487.79,-129.46 1487.79,-200.17 1454.32,-200.17 1454.32,-187.37 1460.2,-181.72
VDD_CPU on Bottom Layer "Bottom Layer-VDD_CPU" (solid, remove dead copper, pour order 22): 1528.1,758.53 1528.1,648 1531.83,644.27 1708.3,644.27 1712.36,648.33 1712.36,707.06 1706.98,712.43 1607.39,712.43 1601.74,718.09 1601.74,758.53
NetL4_2 on Bottom Layer "Bottom Layer-$26N1792" (solid, remove dead copper, pour order 31): 1716.91,-5.64 1750.02,27.47 1750.02,65.84 1789.39,65.84 1789.39,-14.3 1714.91,-14.3 1702.59,-14.3 1670.76,-14.3 1670.76,-5.64
VDD_GPU on Bottom Layer "Bottom Layer-VDD_GPU" (solid, remove dead copper, pour order 28): 1950.42,17.45 1954.68,21.72 1954.68,62.24 1951.08,65.84 1890.23,65.84 1884.54,71.52 1884.54,147.53 1854.3,147.53 1854.3,71.94 1848.2,65.84 1800.49,65.84 1800.49,-14.3 1854.3,-14.3 1854.3,17.45
NetL3_2 on Bottom Layer "Bottom Layer-$26N670" (solid, remove dead copper, pour order 26): 1707.76,-55.64 1686.51,-55.64 1686.51,-46.98 1724.24,-46.98 1750.59,-73.32 1788.39,-73.32 1788.39,-160.24 1744.18,-160.24 1744.18,-92.06
VCC3V3_SYS on Bottom Layer "Bottom Layer-VCC3V3_SYS 1" (solid, remove dead copper, pour order 27): 1726.66,-41.86 1670.76,-41.86 1670.76,-19.42 1716.15,-19.42 1788.39,-19.42 1788.39,-67.71 1752.51,-67.71
VDD_NPU on Bottom Layer "Bottom Layer-VDD_NPU" (solid, remove dead copper, pour order 3): 1555.23,302.59 1568.57,289.25 1568.57,226.99 1648.25,226.99 1648.25,279.14 1617.35,279.14 1604.49,292 1604.49,448.89 1620.29,464.68 1620.29,554.88 1584.76,554.88 1584.76,490.58 1578.75,484.58 1555.23,484.58
GND on GND-4 "GND_L09_P049" (solid, pour order 49): 422.36,-406.75 ccw(c473.88,-406.75) 473.88,-458.27 2969.38,-458.27 ccw(c2969.34,-170.56) 3257.05,-170.52 3257,171.83 3256.7,519.23 ccw(c2974.4,519.27) 2974.44,801.57 473.88,801.57 ccw(c473.88,750.05) 422.36,750.05
GND on Top Layer "Top Layer-GND 1" (solid, remove dead copper, pour order 33): 1740.18,-88.15 1747.06,-95.03 1845.18,-95.03 1850.18,-90.03 1850.18,1.31 1847.01,4.48 1744.45,4.48 1740.18,0.21
GND on Top Layer "GND_L01_P075" (solid, remove dead copper, pour order 75): 422.36,-406.75 ccw(c473.88,-406.75) 473.88,-458.27 2969.38,-458.27 ccw(c2969.34,-170.56) 3257.05,-170.52 3257,171.83 3256.7,519.23 ccw(c2974.4,519.27) 2974.44,801.57 473.88,801.57 ccw(c473.88,750.05) 422.36,750.05
VCCA1V8_PMU on Top Layer "VCCA1V8_PMU_L01_P047" (solid, pour order 47): 1667.68,-19.77 1667.68,27.72 1686.5,27.72 1709.39,50.62 1727.14,50.62 1727.14,17.21 1690.16,-19.77
GND on Top Layer "Top Layer-GND 4" (solid, remove dead copper, pour order 62): 1538.47,722.53 1803.11,722.53 1803.11,778.71 1797.05,784.77 1544.06,784.77 1538.47,779.18
VCC3V3_SYS on Top Layer "VCC3V3_SYS_L01_P017" (solid, pour order 17): 1489.36,226.42 1489.36,162.72 1504.82,162.72 1504.82,147.2 1489.36,147.2 1489.36,111.1 1444.45,111.1 1444.45,139.1 1418.55,139.1 1418.55,226.42
VCC_3V3 on Top Layer "VCC_3V3_L01_P014" (solid, pour order 14): 2461.64,-439.11 2470.63,-448.1 2497.32,-448.1 2609.6,-448.1 2609.6,-412.77 2514.93,-412.77 2504.21,-402.05 2504.21,-367.1 2515.54,-355.77 2609.6,-355.77 2609.6,-330.34 2414.79,-330.34 2414.79,-301.15 2378.51,-301.15 2378.51,-370.05 2447.4,-370.05 2461.64,-384.29
USB_5V on Top Layer "USB_5V_L01_P019" (solid, pour order 19): 506.99,112.84 553.97,112.84 553.97,132.02 506.99,132.02 506.99,210.92 553.97,210.92 553.97,229.71 422.36,229.71 422.36,102.55 506.99,102.55
VDD_CPU on Top Layer "Top Layer-VDD_CPU" (solid, remove dead copper, pour order 18): 1538.47,697.8 1538.47,648.29 1543.01,643.76 1723.29,643.76 1727.86,639.2 1727.86,599.59 1732.36,595.09 1798.49,595.09 1803.11,599.7 1803.11,697.8
VCC3V3_SYS on Top Layer "VCC3V3_SYS_L01_P039" (solid, pour order 39): 1669.68,33.17 1688.07,33.17 1709.93,55.03 1727.14,55.03 1727.14,76.54 1697.56,76.54 1669.68,48.67
VDD_LOGIC on Top Layer "Top Layer-VDD_LOGIC" (solid, remove dead copper, pour order 38): 1746.16,-99.99 1740.18,-105.97 1740.18,-161.54 1865.18,-161.54 1865.18,-108.12 1857.05,-99.99
VDD_GPU on Top Layer "Top Layer-VDD_GPU" (solid, remove dead copper, pour order 34): 1843.9,72.46 1850.18,66.17 1850.18,13.13 1847.03,9.97 1743.49,9.97 1740.18,13.28 1740.18,67.03 1745.61,72.46
GND on GND-1 "GND_L02_P070" (solid, pour order 70): 422.36,-406.75 ccw(c473.88,-406.75) 473.88,-458.27 2969.38,-458.27 ccw(c2969.34,-170.56) 3257.05,-170.52 3257,171.83 3256.7,519.23 ccw(c2974.4,519.27) 2974.44,801.57 473.88,801.57 ccw(c473.88,750.05) 422.36,750.05
VCC0V6_DDR on PWR-2 "VCC7-VCC0V6_DDR" (solid, remove dead copper, pour order 46): 2811.61,-44.59 3257,-44.59 3257,533.1 3248.58,587.91 3235.23,627.27 3216.85,664.54 3192.65,698.33 3174.05,718.86 3131.27,753.97 3095.28,774.76 3056.39,789.4 3029.52,796.14 2961.7,801.57 1620.06,801.57 1711.25,710.38 2178.52,710.38 2178.52,332.59 2463.81,47.3 2719.72,47.3
VCC3V3_SYS on PWR-2 "VCC3V3_SYS_L06_P078" (solid, pour order 78): 2102.75,31.82 2717.94,31.82 2806.92,-57.16 3257.04,-57.16 3255.67,-58.53 3255.67,-198.72 3240.57,-267.57 3200.74,-342.13 3140.39,-401.91 3079.48,-436.36 2997.58,-456.88 2948.38,-458.27 2614.91,-458.27 2614.91,-96.67 2482.45,-96.67 2421.12,-35.33 2140.78,-35.33 2099.88,-76.24 1693.75,-76.24 1682.61,-65.1 1682.61,31.82 1694.75,43.96 1694.75,179.17 1682.61,191.31 1610.01,263.92 1759.71,263.92 1991.82,31.82
VCC3V3_SYS on PWR-2 "VCC3V3_SYS_L06_P061" (solid, pour order 61): 1617.95,-198.7 1671.47,-252.21 1671.47,-324.48 1696.16,-349.17 2409.57,-349.17 2456.52,-349.17 2479.53,-326.15 2479.53,-210.92 2974.44,-210.92 2974.44,-458.27 458.08,-458.27 422.36,-422.55 422.36,-95.95 686.07,-95.95 706.06,-75.96 706.06,801.57 1432.85,801.57 1432.85,330.68 1617.95,145.58
VDD_CPU on PWR-2 "VCC7-VDD_CPU" (solid, remove dead copper, pour order 40): 2319.12,47.23 2446.84,47.23 2160.91,333.16 2160.91,714.9 1840.5,714.9 1840.5,693.31 1538.27,693.31 1530.89,685.93 1530.89,634.28 1705.23,634.28 2005.57,333.94 2018.84,347.52
VDD_NPU on PWR-2 "VCC7-VDD_NPU" (solid, remove dead copper, pour order 41): 1634.82,473.52 1673.36,434.97 1673.36,410.92 2037.05,47.23 2303.67,47.23 2013.49,337.41 1953.58,277.51 1668.73,562.36 1577.65,562.36 1577.65,485.96 1590.1,473.52
USB_5V on PWR-2 "USB_5V_L06_P021" (solid, pour order 21): 422.36,798.8 695.29,798.8 695.29,-69.19 680.08,-84.4 422.36,-84.4
VCC3V3_PMU on PWR-2 "VCC3V3_PMU_L06_P042" (solid, pour order 42): 1675.83,570.31 1577.65,570.31 1577.65,610.05 1696.67,610.05 1987.54,319.17 1957.25,288.88
USB_5V on PWR-1 "USB_5V_L05_P073" (solid, pour order 73): 695.29,801.57 695.29,-72.06 680.34,-87.01 422.36,-87.01 422.36,801.57
VDD_GPU on PWR-1 "VCC4-VDD_GPU" (solid, remove dead copper, pour order 45): 1804.52,279.65 1842.11,279.65 1859.13,262.63 1859.13,172.64 1846.03,159.55 1806.48,159.55 1763.99,117.06 1763.99,93.9 1799.28,93.9 1809.26,83.92 1809.26,8.8 1809.26,-69.29 1932.18,-69.29 2044.98,43.5 2044.98,271.55 2165.81,392.38 2165.81,506.78 2056.09,506.78 2005.85,456.53 1842.94,456.89 1799.28,413.22 1799.28,284.89
VCC_DDR on PWR-1 "VCC4-VCC_DDR" (solid, remove dead copper, pour order 58): 3020.69,721.22 cw(c3020.69,589.6) 3152.31,589.6 3152.31,250.54 3134.54,232.77 2977.61,232.77 2968.1,223.26 2968.58,222.78 2968.58,128.57 2985.58,111.57 3140.49,111.57 3152.31,99.75 3152.31,-112.67 3130.81,-134.17 2622.82,-134.17 2389.88,-367.1 1525.68,-367.11 1504.49,-345.91 1504.49,-219.67 1629.73,-219.67 1684.86,-274.8 2250.04,-274.8 2277.8,-247.03 2277.8,215.95 2260.66,233.09 2260.66,695.11 2286.78,721.22
VCC1V8_DDR on PWR-1 "VCC1V8_DDR_L05_P013" (solid, pour order 13): 2977.71,134.95 2989.36,123.3 3137.78,123.3 3152.31,137.82 3152.31,209.11 3135.79,225.64 2982.82,225.64 2977.71,220.52
VCC_3V3 on PWR-1 "VCC4-VCC_3V3" (solid, remove dead copper, pour order 60): 1778.53,422.87 1778.53,394.81 1798.26,374.97 1798.26,-173.02 2262.36,-173.02 2262.36,-241.42 2241.56,-262.21 1687.53,-262.21 1634.99,-209.67 1504.03,-209.67 1492.65,-198.29 1492.65,-164.75 1470.43,-139.03 1470.43,154.69 1492.65,176.91 1492.65,502.86 1510.04,521.8 1656.89,521.8 1656.89,612.14 1347.47,612.14 1336.99,622.63 1336.99,797.78 1432.06,797.78 1432.06,736.7 1454.06,714.7 1454.27,714.9 2251.13,714.9 2251.13,515.22 2051.45,515.22 2012.63,476.4 1832.06,476.4
VCC5V0_SYS on PWR-1 "VCC5V0_SYS_L05_P072" (solid, pour order 72): 1329.24,801.57 1329.24,618.2 1341.99,605.45 1453.5,605.45 1453.5,193.54 1432.78,172.82 1432.78,137.44 1432.78,-181.2 1471.24,-219.67 1492.33,-219.67 1492.33,-351.78 1519.15,-378.6 2401.07,-378.6 2603.85,-175.82 3137.65,-175.82 3152.31,-190.48 3152.31,-391.96 3140.97,-401.91 3092.54,-430.95 3039.37,-449.98 2983.52,-458.27 460.83,-458.27 422.36,-419.8 422.36,-98.91 685.09,-98.91 706.99,-77.01 706.99,801.57
VDD_LOGIC on PWR-1 "VCC4-VDD_LOGIC" (solid, remove dead copper, pour order 29): 1809.26,-162.41 2240.87,-162.41 2250.61,-152.67 2250.61,504.67 2172.14,504.67 2172.14,388.73 2054.97,271.56 2054.97,37.69 1937.57,-79.71 1809.26,-79.71
GND on GND-3 "GND_L07_P050" (solid, pour order 50): 422.36,-406.75 ccw(c473.88,-406.75) 473.88,-458.27 2969.38,-458.27 ccw(c2969.34,-170.56) 3257.05,-170.52 3257,171.83 3256.7,519.23 ccw(c2974.4,519.27) 2974.44,801.57 473.88,801.57 ccw(c473.88,750.05) 422.36,750.05
GND on GND-2 "GND_L04_P051" (solid, pour order 51): 422.36,-406.75 ccw(c473.88,-406.75) 473.88,-458.27 2969.38,-458.27 ccw(c2969.34,-170.56) 3257.05,-170.52 3257,171.83 3256.7,519.23 ccw(c2974.4,519.27) 2974.44,801.57 473.88,801.57 ccw(c473.88,750.05) 422.36,750.05
GND on Signal L1 "GND_L03_P077" (solid, remove dead copper, pour order 77): 2812.22,750.89 2784.19,722.86 2286.97,722.86 2258.1,750.89 1502.9,750.89 1502.9,801.57 2981.38,801.57 3056.39,789.4 3131.27,753.97 3174.05,716.16 3201.45,687.61 3226.04,645.9 3248.58,587.91 3257.05,533.1 3257.05,-184.66 3235.17,-280.63 3200.74,-342.13 3129.22,-409.76 3052.9,-445.87 2983.52,-458.27 631.36,-458.27 422.36,-458.27 422.36,801.57 1216.16,801.57 1216.16,716.16 872.39,716.16 846.73,716.16 804.94,674.37 804.94,272.06 666.93,272.06 641.16,246.3 641.16,-52.87 714.41,-126.11 714.41,-310.72 761.22,-357.54 2496.67,-357.54 2496.67,-203.62 2698.81,-203.62 2698.81,-51.24 3165.77,-51.24 3165.77,567.03 ccw(c2981.92,567.04) 2981.91,750.89
VCC3V3_SYS on Signal L1 "VCC3V3_SYS_L03_P074" (solid, pour order 74): 1694.61,212.25 1694.61,146.91 1683.04,135.33 1429.92,135.33 1418.55,146.71 1418.55,217.43 1428.3,227.18 1679.68,227.18

## Other copper
Top Layer:
  rectangle net VCC12D_RX: 1015.63,93.42 1047.13,121.28
  rectangle net VCC12A_RX: 932.88,26.3 952.37,61.75
  rectangle net VCC12A_RX: 942.54,49.93 979.83,61.75
  rectangle net VCC12D_RX: 993.88,49.93 1031.17,61.75
  rectangle net GND: 942.54,65.93 1031.51,85.37
  rectangle net GND: 747.83,78.15 807.13,96.15
  rectangle net VCC_1V2: 1186.66,-194.53 1222.51,-163.03
  rectangle net VCC5V0_SYS: 1438.14,-230.73 1480.18,-202.51
  region net GND: 1194.95,385.96 1194.95,233.17 1214.64,233.17 1214.64,385.96
  rectangle net GND: 1305.82,549.02 1372.26,568.7
  rectangle net GND: 1305.82,478.15 1372.26,497.84
  rectangle net GND: 1305.82,371.85 1372.26,391.54
  rectangle net VCC3V3_SYS: 967.96,145.78 1003.36,222.38
  rectangle net VCC_1V2: 1015.63,145.78 1061.65,169.4
  region net VCC12_TX: 865.62,-359.93 828.03,-359.93 828.03,-396.16 865.62,-396.16
  region net VCC33_TX: 910.59,-359.93 872.17,-359.93 872.17,-395.68 910.59,-395.68
  rectangle net VCC3V3_SYS: 872.17,-438.67 909.96,-402.93
  rectangle net VCC_1V2: 828.28,-438.67 865.62,-402.93
  rectangle net GND: 1565.33,-74.41 1641.68,54.26
  rectangle net VCC33_TX: 677.21,-35.89 767.33,5.93
  rectangle net VCC5V0_SYS: 445.53,-249.32 623.32,-161.6
  rectangle net VCC12A_RX: 821.07,32.01 846.08,59.15
  rectangle net VCC12A_RX: 671.62,28.51 835.97,52.75
  rectangle net VCC_3V3: 2534.27,-426.67 2581.35,-416.36
  rectangle net VCC_3V3: 2150.21,-233.45 2178.97,-215.45
  region net GND: 2162.01,661.78 2156.05,667.73 2142.97,654.64 2148.92,648.69
  rectangle net GND: 2247.59,576.17 2263.28,583.18
  rectangle net GND: 1068.1,6.69 1086.1,37.27
  rectangle net GND: 738.57,174.89 816.01,198.89
  rectangle net VCC3V3_SYS: 972.85,157.59 997.85,201.23
  rectangle net NetC5_2: 1265.57,257.58 1315.43,301.87
  rectangle net VCC_WL: 1296.42,690.75 1337.65,789.27
  rectangle net GND: 726.36,690.75 784.37,789.27
  rectangle net eMMC_CMD: 2242.06,-227.4 2253.79,-210.4
  region net LPDDR4_DQS0_B_N: 2420.35,212.64 2413.28,219.71 2410.8,217.23 2417.88,210.16
  rectangle net MIPI_CSI_RX_CLK0_N: 1013.39,-212.07 1052.76,-203.21
  rectangle net MIPI_CSI_RX_CLK0_P: 1013.39,-226.84 1052.76,-217.98
  rectangle net GND: 2854.92,-442.64 2925.79,-243.83
  rectangle net GND: 2630.51,-442.64 2923.93,-409.35
  rectangle net GND: 2630.51,-442.64 2701.38,-243.83
  rectangle net NetR51_2: 1232.9,229.23 1246.53,279.73
  rectangle net GND: 483.64,-6.14 543.1,69.09
  rectangle net VCC3V3_SYS: 516.65,-324.72 623.32,-256.69
  rectangle net USB_5V: 445.53,-87.27 623.32,-23.81
  rectangle net MIPI_CSI_RX_D0_N: 1013.39,-275.06 1052.76,-266.2
  rectangle net MIPI_CSI_RX_D0_P: 1013.39,-289.83 1052.76,-280.97
  rectangle net MIPI_CSI_RX_D1_N: 1013.39,-243.56 1052.76,-234.7
  rectangle net MIPI_CSI_RX_D1_P: 1013.39,-258.33 1052.76,-249.47
  rectangle net MIPI_CSI_RX_D2_N: 1013.39,-180.57 1052.76,-171.71
  rectangle net MIPI_CSI_RX_D2_P: 1013.39,-195.34 1052.76,-186.48
  rectangle net MIPI_CSI_RX_D3_P: 1013.39,-163.85 1052.76,-154.99
  rectangle net MIPI_CSI_RX_D3_N: 1013.39,-149.08 1052.76,-140.22
  rectangle net GND: 2135.37,647.41 2160.14,651.64
  rectangle net GND: 2632.48,-442.64 2699.41,-355.49
  rectangle net GND: 2273.1,-204.97 2282.5,-188.81
  rectangle net GND: 2268.58,-198.78 2291,-93.33
  rectangle net GND: 450.87,303.35 537.48,777.73
  rectangle net GND: 445.53,-154.04 623.32,-95.54
  rectangle net HDMI_TX1_N: 2789.96,-283.2 2798.84,-243.83
  region net HDMI_TX1_P: 2813.58,-243.83 2804.71,-243.83 2804.71,-283.2 2813.58,-283.2
  rectangle net HDMI_TXCLK_N: 2742.72,-283.2 2751.6,-243.83
  region net HDMI_TXCLK_P: 2766.34,-243.83 2757.47,-243.83 2757.47,-283.2 2766.34,-283.2
  rectangle net VCC3V3_PMU: 1633.87,551.39 1674.86,598.73
  rectangle net VCC3V3_PMU: 1633.87,567.53 1674.86,598.73
  region net AUX_N: 749.62,-60.61 710.25,-60.61 710.25,-69.36 749.62,-69.36
  rectangle net AUX_P: 710.25,-54.48 749.62,-45.73
  region net LANE0_RX1_N: 972.92,-35.89 972.92,3.48 964.17,3.48 964.17,-35.89
  region net LANE0_RX1_P: 979.05,3.48 979.05,-35.89 987.8,-35.89 987.8,3.48
  region net LANE1_TX1_N: 925.68,-35.89 925.68,3.48 916.93,3.48 916.93,-35.89
  region net LANE1_TX1_P: 931.81,3.48 931.81,-35.89 940.56,-35.89 940.56,3.48
  region net LANE2_RX2_N: 878.44,-35.89 878.44,3.48 869.69,3.48 869.69,-35.89
  region net LANE2_RX2_P: 884.57,3.48 884.57,-35.89 893.32,-35.89 893.32,3.48
  region net LANE3_TX2_N: 831.19,-35.89 831.19,3.48 822.44,3.48 822.44,-35.89
  region net LANE3_TX2_P: 837.32,3.48 837.32,-35.89 846.07,-35.89 846.07,3.48
  rectangle net USB_5V: 490.73,214.76 527.36,226.57
  rectangle net VCC12_TX: 964.17,-388.28 972.05,-319.35
  rectangle net VCC12_TX: 780.96,-383.56 865.62,-359.93
  rectangle net VCC12A_RX: 747.83,40.93 835.97,59.15
  rectangle net VCC33_RX: 929.27,93.42 1005.69,121.28
  rectangle net VCC33_RX: 853.35,39.39 927.81,59.15
  rectangle net VCC33_TX: 948.43,-368.32 956.31,-319.35
  rectangle net VCC33_TX: 872.17,-383.56 956.31,-359.93
  rectangle net VDD: 1155.64,-194.53 1173.64,-115.86
  rectangle net RX2_N: 509.61,253.08 543.1,265.94
  rectangle net RX2_P: 509.61,234.45 543.1,247.34
  rectangle net TX1_P: 509.61,76.97 543.1,89.78
  rectangle net TX1_N: 509.61,95.65 543.1,108.46
  pour cut-out: 2701.19,-288.2 2854.92,-288.2 2854.92,-193.95 2701.19,-193.95
  pour cut-out: 1052.57,-339.03 1052.57,8.99 691.25,8.99 691.25,-339.03
  pour cut-out: 468.8,-458.27 454.16,-454.35 437.45,-443.18 433.33,-439.6 433.33,-153.34 632.19,-153.34 632.19,-330.35 660.11,-330.35 660.11,-338.27 601.31,-338.27 601.31,-458.27
  pour cut-out: 433.33,-95.95 635.1,-95.95 635.1,-16.54 433.33,-16.54
  pour cut-out: 2104.27,743.69 2214.22,743.69 2613.87,344.04 2133.39,-136.44 1678.77,318.19
  pour cut-out: 2302.24,114.17 2452.67,-36.26 3086.16,-36.26 3152.31,29.89 3152.31,639.98 3080.31,711.98 2468.01,711.98 2302.24,546.21
  pour cut-out: 2395.35,-93.33 2395.35,-90.26 2236.96,-90.26 2236.96,-93.33
  pour cut-out: 2124.99,-175.63 2215.1,-175.63 2215.1,-138.63 2124.99,-138.63
  pour cut-out: 2464.96,-182.25 2471.85,-182.25 2471.85,-68.24 2464.96,-68.24
  pour cut-out: 1538.27,722.53 1538.27,694.68 1858.01,694.68 1858.01,722.53
  pour cut-out: 1868.13,507.94 1814.79,561.27 1615.19,361.67 1668.53,308.34
  pour cut-out: 1410.97,493.24 1450.9,493.24 1450.9,595.18 1410.97,595.18
  pour cut-out: 566.38,12.76 735.07,12.76 735.07,287.71 567.01,287.71 566.38,287.08
  region net VCCIO_WL: 1267.31,651.51 1296.42,651.51 1308.36,639.57 1350.12,639.57 1350.12,619.88 1308.51,619.88 1295.47,606.85 1267.31,606.85
  pour cut-out: 1256.71,241.73 1256.71,252.17 1293.36,252.17 1293.36,369.16 792.98,369.16 792.98,241.73
  pour cut-out: 1253.55,801.57 1361.62,801.57 1361.62,323.82 1253.55,323.82
  pour cut-out: 792.98,707.73 792.98,801.57 1293.36,801.57 1293.36,707.73
  pour cut-out: 1801.53,166.01 1807.18,160.36 1814.38,160.36 1878.19,224.17 1903.61,198.75 1804.23,99.36 1702.48,99.36 1674.17,71.05 1555.75,71.05 1544.16,82.64 1544.16,237.59 1549.73,243.16 1606.2,243.16 1628.84,220.53 1706.51,220.53 1727.56,199.48 1790.44,199.48 1801.53,188.39
PWR-1:
  region net VCC3V3_PMU: 1467.7,-190.35 1482.7,-175.35 1462.69,-155.33 1447.68,-170.33
  rectangle net VCCIO_WL: 1260.37,605.45 1302.27,656.92
PWR-2:
  region net VCC3V3_SYS: 1704.65,54.31 1719.4,55.86 1717.59,73.02 1702.85,71.47
  rectangle net VCC3V3_SYS: 1708.47,61.26 1719.15,87.33
  pour cut-out: 1627.99,535.03 ccw(c1640.39,535.03) 1640.39,522.63 ccw(c1640.39,535.03) 1652.79,535.03 ccw(c1640.39,535.03) 1640.39,547.43 ccw(c1640.39,535.03)
Signal L2:
  rectangle net VCC12_TX: 854.63,-372.23 1006.19,-362.24
  rectangle net VCC12_TX: 836.9,-394.78 858.45,-382.12
  region net VCC12_TX: 869.87,-370.29 861.85,-362.27 840.41,-383.71 848.43,-391.73